# Altium PCB MainBoardPCB_PWR.PcbDoc (part 4 of 29)
Units mm, origin at the board's own origin, x right, y up, seen from the top; angles counter-clockwise.
Board outline 333.63 x 349.38 mm, 16 copper layers (L1, L2 (GND), L3 (Sign), L4 (GND), L5 (Sign), L6 (PWR/GND), L7(PWR/GND), L8 (PWR/GND), L9 (PWR/GND), L10 (PWR/GND), L11 (PWR/GND), L12 (Sign), L13 (GND), L14 (Sign), L15 (GND), L16), stack 2.503 mm thick; 2187 components, 1615 nets, 7987 pads, 1695 vias.
Unrouted connection lines stored in the file: 4757.
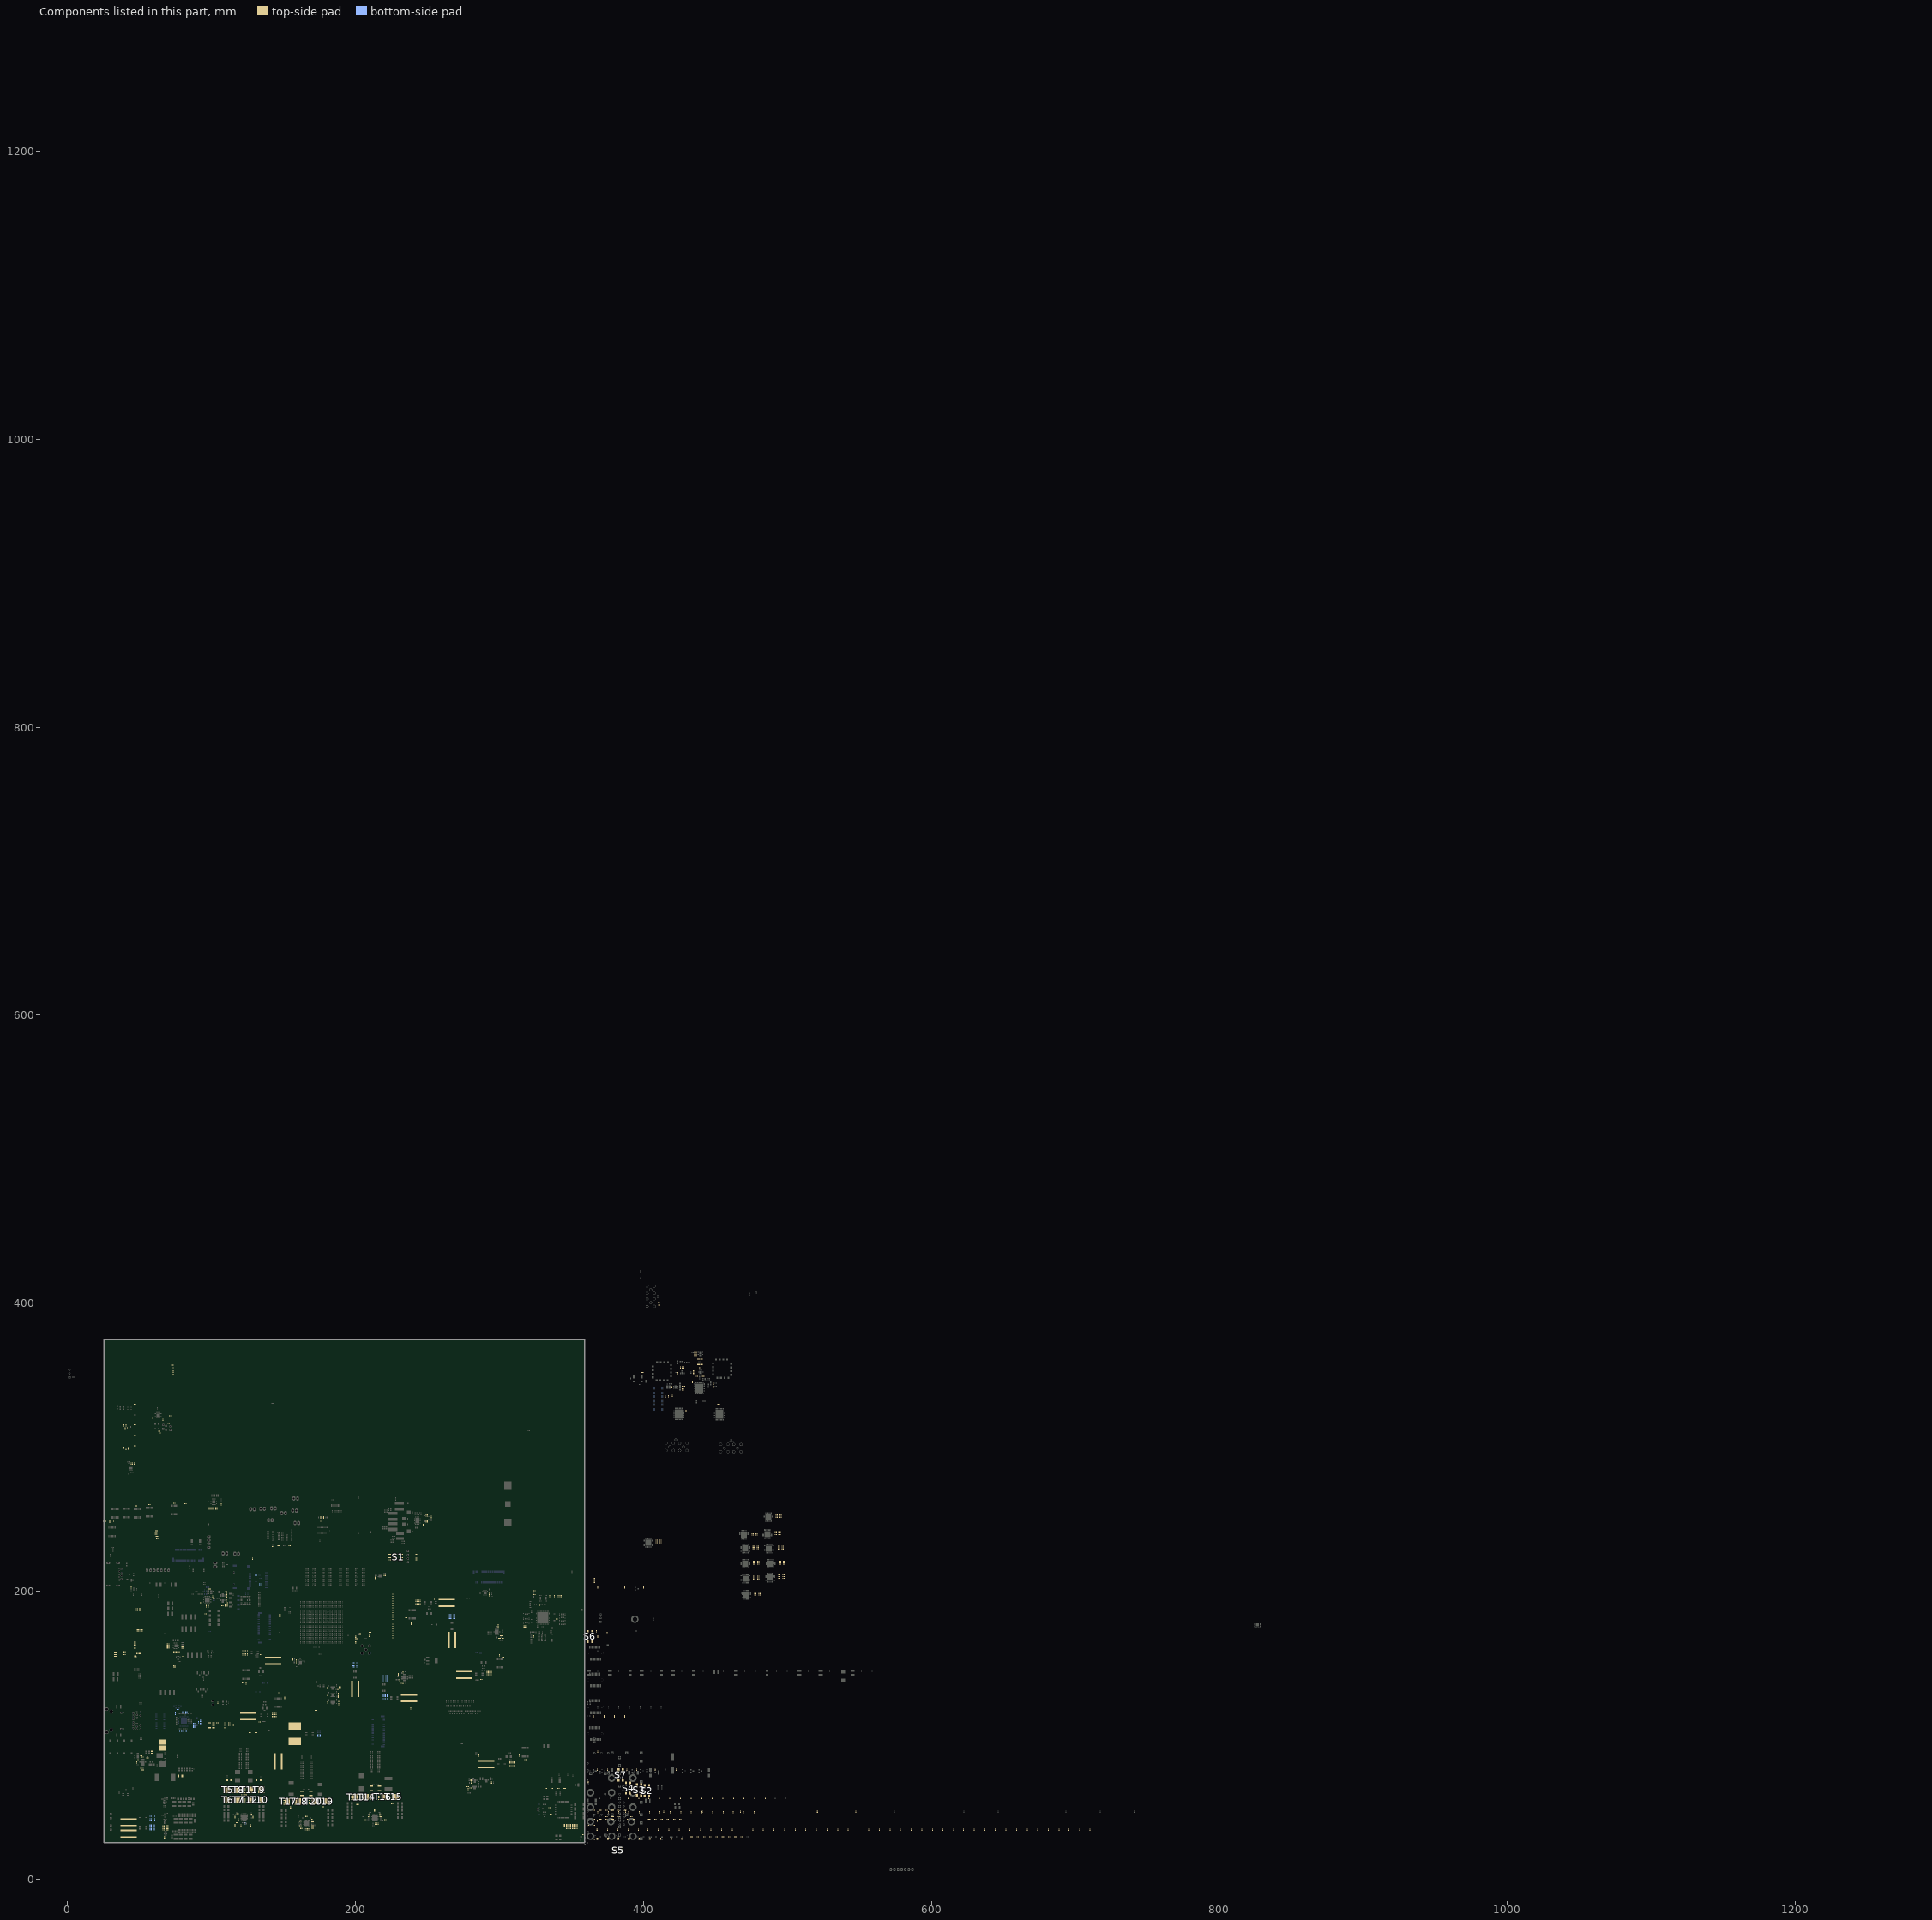
[diagram p11: the components of this part, seen from the top]

## Components (designator, comment, footprint, x,y, rotation, side; value= is the part's Value field where it differs from the comment) (continued)
R122 "30R" "RES 0402/1005 RF" 86.36,199.263 r0 top
R123 "4.7kR" "RES 0402/1005 RF" 107.442,189.738 r0 top
R124 "1kR" "RES 0402/1005 RF" 172.593,117.221 r180 top
R125 "10kR" "RES 0402/1005 RF" 339.728,180.764 r180 top
R126 "100R" "RES 0402/1005 RF" 335.899,196.61 r270 top
R127 "0R" "RES 0402/1005 RF" 367.995,40.538 r90 top
R128 "10kR" "RES 0402/1005 RF" 317.608,174.88 r180 top
R129 "10kR" "RES 0402/1005 RF" 317.608,175.819 r180 top
R130 "0R" "RES 0402/1005 RF" 334.902,196.597 r270 top
R131 "0R" "RES 0402/1005 RF" 338.144,196.597 r270 top
R132 "0R" "RES 0402/1005 RF" 342.005,196.483 r90 top
R133 "0R" "RES 0402/1005 RF" 343.021,196.483 r90 top
R134 "0R" "RES 0402/1005 RF" 340.998,196.528 r90 top
R135 "4.7kR" "RES 0402/1005 RF" 47.255,154.305 r0 top
R136 "4.7kR" "RES 0402/1005 RF" 46.99,155.067 r0 top
R137 "4.7kR" "RES 0402/1005 RF" 46.805,160.274 r0 top
R138 "4.7kR" "RES 0402/1005 RF" 33.216,154.695 r0 top
R139 "0R" "RES 0402/1005 RF" 360.883,40.538 r90 top
R140 "2.2R" "RES 0402/1005 RF" 55.575,84.026 r0 top
R141 "0R" "RES 0402/1005 RF" 50.549,156.46 r0 top
R142 "0R" "RES 0402/1005 RF" 50.549,157.494 r0 top
R143 "0R" "RES 0402/1005 RF" 48.575,156.478 r0 top
R144 "0R" "RES 0402/1005 RF" 48.575,157.494 r0 top
R145 "4.7kR" "RES 0402/1005 RF" 46.736,164.465 r0 top
R146 "4.7kR" "RES 0402/1005 RF" 46.736,162.56 r0 top
R147 "4.7kR" "RES 0402/1005 RF" 46.736,163.449 r0 top
R148 "4.7kR" "RES 0402/1005 RF" 33.216,156.981 r0 top
R149 "196kR" "RES 0402/1005 RF" 52.232,84.777 r0 top
R150 "22k" "RES 0402/1005 RF" 52.332,75.895 r0 top
R151 "0R" "RES 0402/1005 RF" 51.393,173.303 r0 top
R152 "0R" "RES 0402/1005 RF" 51.346,172.287 r0 top
R153 "0R" "RES 0402/1005 RF" 48.98,173.303 r0 top
R154 "0R" "RES 0402/1005 RF" 48.98,172.287 r0 top
R155 "4.7kR" "RES 0402/1005 RF" 39.693,158.115 r0 top
R156 "4.7kR" "RES 0402/1005 RF" 39.693,157.099 r0 top
R157 "4.7kR" "RES 0402/1005 RF" 39.684,155.829 r0 top
R158 "4.7kR" "RES 0402/1005 RF" 33.216,155.956 r0 top
R159 "10kR" "RES 0402/1005 RF" 51.307,85.787 r0 top
R160 "910R" "RES 0402/1005 RF" 51.883,77.43 r90 top
R161 "0R" "RES 0402/1005 RF" 50.473,187.654 r0 top
R162 "0R" "RES 0402/1005 RF" 50.473,186.638 r0 top
R163 "0R" "RES 0402/1005 RF" 48.234,187.654 r0 top
R164 "0R" "RES 0402/1005 RF" 48.234,186.638 r0 top
R165 "100R" "RES 0402/1005 RF" 178.738,249.428 r0 top
R166 "100R" "RES 0402/1005 RF" 176.394,248.666 r0 top
R167 "100R" "RES 0402/1005 RF" 178.029,251.222 r90 top
R168 "100R" "RES 0402/1005 RF" 175.87,251.222 r90 top
R169 "100R" "RES 0402/1005 RF" 150.495,232.621 r0 top
R170 "100R" "RES 0402/1005 RF" 146.685,231.605 r0 top
R171 "100R" "RES 0402/1005 RF" 154.292,231.605 r0 top
R172 "100R" "RES 0402/1005 RF" 142.748,230.97 r0 top
R173 "500R" "RES 0402/1005 RF" 360.883,28.042 r90 top
R174 "0mR" "RES 0402/1005 RF" 242.95,190.832 r270 top
R175 "0mR" "RES 0402/1005 RF" 241.934,190.832 r270 top
R176 "0mR" "RES 0402/1005 RF" 245.03,190.832 r270 top
R177 "0mR" "RES 0402/1005 RF" 244.014,190.832 r270 top
R178 "0mR" "RES 0402/1005 RF" 242.95,193.209 r90 top
R179 "0mR" "RES 0402/1005 RF" 241.934,193.209 r90 top
R180 "0mR" "RES 0402/1005 RF" 245.03,193.209 r90 top
R181 "0mR" "RES 0402/1005 RF" 244.014,193.209 r90 top
R182 "1.02kR" "RES 0402/1005 RF" 254.912,194.739 r90 top
R183 "0mR" "RES 0402/1005 RF" 293.357,143.679 r90 top
R184 "0mR" "RES 0402/1005 RF" 294.357,143.679 r90 top
R185 "0mR" "RES 0402/1005 RF" 291.357,143.679 r90 top
R186 "0mR" "RES 0402/1005 RF" 292.357,143.679 r90 top
R187 "0mR" "RES 0402/1005 RF" 293.357,141.493 r270 top
R188 "0mR" "RES 0402/1005 RF" 294.357,141.493 r270 top
R189 "0mR" "RES 0402/1005 RF" 291.357,141.493 r270 top
R190 "0mR" "RES 0402/1005 RF" 292.357,141.493 r270 top
R191 "1.02kR" "RES 0402/1005 RF" 287.374,138.68 r0 top
R192 "0mR" "RES 0402/1005 RF" 122.794,156.081 r270 top
R193 "0mR" "RES 0402/1005 RF" 121.735,156.081 r270 top
R194 "0mR" "RES 0402/1005 RF" 124.91,156.081 r270 top
R195 "0mR" "RES 0402/1005 RF" 123.852,156.081 r270 top
R196 "0mR" "RES 0402/1005 RF" 122.794,158.113 r90 top
R197 "0mR" "RES 0402/1005 RF" 121.735,158.113 r90 top
R198 "0mR" "RES 0402/1005 RF" 124.91,158.113 r90 top
R199 "0mR" "RES 0402/1005 RF" 123.852,158.113 r90 top
R200 "1.02kR" "RES 0402/1005 RF" 134.297,155.956 r0 top
R201 "0mR" "RES 0402/1005 RF" 144.008,114.727 r90 top
R202 "0mR" "RES 0402/1005 RF" 144.958,114.727 r90 top
R203 "0mR" "RES 0402/1005 RF" 142.088,114.727 r90 top
R204 "0mR" "RES 0402/1005 RF" 143.053,114.732 r90 top
R205 "0mR" "RES 0402/1005 RF" 144.008,112.571 r270 top
R206 "0mR" "RES 0402/1005 RF" 144.958,112.571 r270 top
R207 "0mR" "RES 0402/1005 RF" 142.088,112.568 r270 top
R208 "0mR" "RES 0402/1005 RF" 143.053,112.568 r270 top
R209 "1.02kR" "RES 0402/1005 RF" 133.501,109.15 r180 top
R210 "0mR" "RES 0402/1005 RF" 309.27,81.218 r90 top
R211 "0mR" "RES 0402/1005 RF" 310.314,81.218 r90 top
R212 "12.5k" "RES 0402/1005 RF" 251.788,251.574 r90 top
R213 "0mR" "RES 0402/1005 RF" 307.166,81.218 r90 top
R214 "10kR" "RES 0402/1005 RF" 252.738,251.574 r270 top
R215 "0mR" "RES 0402/1005 RF" 308.227,81.218 r90 top
R216 "31.2kR" "RES 0402/1005 RF" 249.13,252.624 r270 top
R217 "0mR" "RES 0402/1005 RF" 309.27,78.437 r270 top
R218 "10kR" "RES 0402/1005 RF" 250.096,252.624 r270 top
R219 "0mR" "RES 0402/1005 RF" 310.314,78.437 r270 top
R220 "4.99kR" "RES 0402/1005 RF" 249.13,248.499 r270 top
R221 "0mR" "RES 0402/1005 RF" 307.166,78.441 r270 top
R222 "0mR" "RES 0402/1005 RF" 308.227,78.441 r270 top
R223_I2C_Bridge "1kR" "RES 0402/1005 RF" 106.426,260.867 r0 top (schematic designator R223)
R223_I2C_Bridge_2 "1kR" "RES 0402/1005 RF" 547.548,46.787 r90 top (schematic designator R223)
R223_I2C_Bridge_3 "1kR" "RES 0402/1005 RF" 79.952,161.248 r0 top (schematic designator R223)
R224_I2C_Bridge "1kR" "RES 0402/1005 RF" 106.426,259.812 r0 top (schematic designator R224)
R224_I2C_Bridge_2 "1kR" "RES 0402/1005 RF" 520.878,46.787 r90 top (schematic designator R224)
R224_I2C_Bridge_3 "1kR" "RES 0402/1005 RF" 79.952,160.274 r0 top (schematic designator R224)
R225_I2C_Bridge "1kR" "RES 0402/1005 RF" 103.886,257.487 r270 top (schematic designator R225)
R225_I2C_Bridge_2 "1kR" "RES 0402/1005 RF" 494.208,46.787 r90 top (schematic designator R225)
R225_I2C_Bridge_3 "1kR" "RES 0402/1005 RF" 77.471,157.607 r270 top (schematic designator R225)
R226_I2C_Bridge "1kR" "RES 0402/1005 RF" 102.85,257.487 r270 top (schematic designator R226)
R226_I2C_Bridge_2 "1kR" "RES 0402/1005 RF" 467.538,46.787 r90 top (schematic designator R226)
R226_I2C_Bridge_3 "1kR" "RES 0402/1005 RF" 76.506,157.607 r270 top (schematic designator R226)
R227_I2C_Bridge "1kR" "RES 0402/1005 RF" 101.85,257.487 r270 top (schematic designator R227)
R227_I2C_Bridge_2 "1kR" "RES 0402/1005 RF" 440.893,46.787 r90 top (schematic designator R227)
R227_I2C_Bridge_3 "1kR" "RES 0402/1005 RF" 75.54,157.607 r270 top (schematic designator R227)
R228 "1.02kR" "RES 0402/1005 RF" 285.883,85.729 r90 top
R229 "0mR" "RES 0402/1005 RF" 59.385,37.078 r90 bottom
R230 "0mR" "RES 0402/1005 RF" 60.465,37.078 r90 bottom
R231_SPI_bridge1 "1kR" "RES 0402/1005 RF" 238.618,177.387 r90 top (schematic designator R231)
R231_SPI_bridge2 "1kR" "RES 0402/1005 RF" 411.039,398.754 r0 top (schematic designator R231)
R231_SPI_bridge3 "1kR" "RES 0402/1005 RF" 74.237,261.112 r180 top (schematic designator R231)
R232_SPI_bridge1 "1kR" "RES 0402/1005 RF" 235.247,181.451 r0 top (schematic designator R232)
R232_SPI_bridge2 "1kR" "RES 0402/1005 RF" 410.716,400.405 r0 top (schematic designator R232)
R232_SPI_bridge3 "1kR" "RES 0402/1005 RF" 62.103,238.125 r0 top (schematic designator R232)
R233_SPI_bridge1 "1kR" "RES 0402/1005 RF" 299.974,155.533 r270 top (schematic designator R233)
R233_SPI_bridge2 "1kR" "RES 0402/1005 RF" 420.04,335.691 r90 top (schematic designator R233)
R233_SPI_bridge3 "1kR" "RES 0402/1005 RF" 96.012,184.333 r180 top (schematic designator R233)
R234_SPI_bridge1 "1kR" "RES 0402/1005 RF" 302.583,154.136 r180 top (schematic designator R234)
R234_SPI_bridge2 "1kR" "RES 0402/1005 RF" 415.158,335.114 r90 top (schematic designator R234)
R234_SPI_bridge3 "1kR" "RES 0402/1005 RF" 61.838,241.935 r0 top (schematic designator R234)
R235_SPI_bridge1 "1kR" "RES 0402/1005 RF" 121.772,136.265 r0 top (schematic designator R235)
R235_SPI_bridge2 "1kR" "RES 0402/1005 RF" 417.444,335.437 r90 top (schematic designator R235)
R235_SPI_bridge3 "1kR" "RES 0402/1005 RF" 62.288,236.453 r0 top (schematic designator R235)
R236_SPI_bridge1 "1kR" "RES 0402/1005 RF" 123.952,135.763 r90 top (schematic designator R236)
R236_SPI_bridge2 "1kR" "RES 0402/1005 RF" 433.984,345.313 r90 top (schematic designator R236)
R236_SPI_bridge3 "1kR" "RES 0402/1005 RF" 47.498,259.207 r180 top (schematic designator R236)
R237_SPI_bridge1 "1kR" "RES 0402/1005 RF" 151.003,125.857 r90 top (schematic designator R237)
R237_SPI_bridge2 "1kR" "RES 0402/1005 RF" 32.004,248.92 r90 top (schematic designator R237)
R237_SPI_bridge3 "1kR" "RES 0402/1005 RF" 61.503,240.792 r0 top (schematic designator R237)
R238_SPI_bridge1 "1kR" "RES 0402/1005 RF" 146.685,129.032 r270 top (schematic designator R238)
R238_SPI_bridge2 "1kR" "RES 0402/1005 RF" 29.464,248.285 r90 top (schematic designator R238)
R238_SPI_bridge3 "1kR" "RES 0402/1005 RF" 56.896,260.096 r180 top (schematic designator R238)
R239_SPI_bridge1 "1kR" "RES 0402/1005 RF" 313.893,85.725 r270 top (schematic designator R239)
R239_SPI_bridge2 "1kR" "RES 0402/1005 RF" 26.543,249.047 r90 top (schematic designator R239)
R239_SPI_bridge3 "1kR" "RES 0402/1005 RF" 61.503,239.649 r0 top (schematic designator R239)
R240_SPI_bridge1 "1kR" "RES 0402/1005 RF" 318.028,83.058 r0 top (schematic designator R240)
R240_SPI_bridge2 "1kR" "RES 0402/1005 RF" 25.019,248.92 r90 top (schematic designator R240)
R240_SPI_bridge3 "1kR" "RES 0402/1005 RF" 81.973,260.858 r180 top (schematic designator R240)
R241 "0mR" "RES 0402/1005 RF" 411.963,28.042 r90 top
R242 "0mR" "RES 0402/1005 RF" 404.597,28.042 r90 top
R243 "0mR" "RES 0402/1005 RF" 397.205,28.042 r90 top
R244 "0mR" "RES 0402/1005 RF" 389.839,28.042 r90 top
R245 "100R" "RES 0402/1005 RF" 439.318,355.092 r180 top
R246 "120R" "RES 0402/1005 RF" 440.303,361.061 r180 top
R247 "127R" "RES 0402/1005 RF" 440.303,357.251 r180 top
R248 "127R" "RES 0402/1005 RF" 438.202,357.251 r0 top
R249 "120R" "RES 0402/1005 RF" 438.202,361.061 r180 top
R250 "82.5R" "RES 0402/1005 RF" 440.303,358.267 r180 top
R251 "82.5R" "RES 0402/1005 RF" 438.202,358.267 r0 top
R252 "1kR" "RES 0402/1005 RF" 435.635,366.083 r90 top
R253 "1kR" "RES 0402/1005 RF" 435.635,364.079 r270 top
R254 "1kR" "RES 0402/1005 RF" 436.651,366.083 r270 top
R255 "1kR" "RES 0402/1005 RF" 436.651,364.079 r90 top
R256 "120R" "RES 0402/1005 RF" 431.825,350.774 r90 top
R257 "49.9R" "RES 0402/1005 RF" 423.951,351.467 r90 top
R258 "120R" "RES 0402/1005 RF" 431.825,352.711 r90 top
R259 "82.5R" "RES 0402/1005 RF" 435.635,352.711 r270 top
R260 "82.5R" "RES 0402/1005 RF" 435.635,350.774 r90 top
R261 "127R" "RES 0402/1005 RF" 434.619,352.711 r270 top
R262 "127R" "RES 0402/1005 RF" 434.619,350.774 r90 top
R263 "60.4kR" "RES 0402/1005 RF" 425.602,355.288 r270 top
R264 "0mR" "RES 0402/1005 RF" 428.112,355.288 r270 top
R265 "0mR" "RES 0402/1005 RF" 426.887,355.288 r270 top
R266 "84.5kR" "RES 0402/1005 RF" 383.235,32.182 r0 top
R267 "4.7kR" "RES 0402/1005 RF" 370.04,32.182 r0 top
R268 "2R" "RES 0402/1005 RF" 120.402,37.326 r90 top
R269 "1.02kR" "RES 0402/1005 RF" 361.391,32.182 r0 top
R270 "160R" "RES 0402/1005 RF" 238.506,118.618 r270 top
R271 "5kR" "RES 0402/1005 RF" 117.796,39.126 r180 top
R272 "2R" "RES 0402/1005 RF" 122.978,38.69 r270 top
R273 "12kR" "RES 0402/1005 RF" 118.596,41.473 r270 top
R274 "10kR" "RES 0402/1005 RF" 250.096,248.503 r90 top
R275 "47kR" "RES 0402/1005 RF" 121.202,58.572 r180 top
R276 "4.7kR" "RES 0402/1005 RF" 387.363,47.739 r0 top
R277 "12kR" "RES 0402/1005 RF" 128.799,43.024 r90 top
R278 "12kR" "RES 0402/1005 RF" 116.439,43.024 r90 top
R279 "0mR" "RES 0402/1005 RF" 383.045,47.739 r0 top
R280 "47kR" "RES 0402/1005 RF" 123.777,58.572 r0 top
R281 "0mR" "RES 0402/1005 RF" 382.981,28.042 r90 top
R282 "0mR" "RES 0402/1005 RF" 378.714,47.739 r0 top
R283 "0mR" "RES 0402/1005 RF" 374.383,47.739 r0 top
R284 "18.2k (1MHz)" "RES 0402/1005 RF" 247.126,245.841 r90 top
R285 "2R" "RES 0402/1005 RF" 201.462,51.702 r0 top
R286 "0mR" "RES 0402/1005 RF" 370.053,47.739 r0 top
R287 "49.9kR" "RES 0402/1005 RF" 205.838,40.864 r90 top
R288 "Resistor_1210" RES_1210 211.045,63.039 r270 top value=3.6R
R289 "2R" "RES 0402/1005 RF" 213.795,38.516 r270 top
R290 "10kR" "RES 0402/1005 RF" 206.788,40.864 r270 top
R291 "150R" "RES 0402/1005 RF" 365.722,47.739 r0 top
R292 "Resistance" "RES 0402/1005 RF" 213.195,47.846 r270 top
R293 "0mR" "RES 0402/1005 RF" 214.795,38.516 r90 top
R294 "0mR" "RES 0402/1005 RF" 215.795,38.516 r90 top
R295 "12kR" "RES 0402/1005 RF" 209.441,43.359 r0 top
R296 "12kR" "RES 0402/1005 RF" 217.555,43.359 r180 top
R297 "10kR" "RES 0402/1005 RF" 221.201,40.765 r90 top
R298 "Resistor_1210" RES_1210 216.76,63.039 r270 top value=3.6R
R299 "47kR" "RES 0402/1005 RF" 214.045,47.846 r270 top
R300 "10kR" "RES 0402/1005 RF" 220.17,40.765 r270 top
R301 "150R" "RES 0402/1005 RF" 391.655,43.434 r0 top
R302 "1.4kR" "RES 0201/0603" 170.009,41.515 r180 top
R303 "2R" "RES 0402/1005 RF" 155.178,49.178 r0 top
R304 "0mR" "RES 0402/1005 RF" 175.712,99.689 r270 bottom
R305 "100R" "RES 0402/1005 RF" 383.019,43.434 r0 top
R306 "Resistor_1210" RES_1210 162.816,59.629 r270 top value=3.6R
R307 "2R" "RES 0402/1005 RF" 165.608,34.537 r270 top
R308 "100R" "RES 0402/1005 RF" 378.689,43.434 r0 top
R309 "100R" "RES 0402/1005 RF" 374.358,43.434 r0 top
R310 "0mR" "RES 0402/1005 RF" 166.533,34.537 r90 top
R311 "100R" "RES 0402/1005 RF" 361.391,67.488 r0 top
R312 "0mR" "RES 0402/1005 RF" 167.448,34.537 r90 top
R313 "12kR" "RES 0402/1005 RF" 161.743,40.015 r0 top
R314 "12kR" "RES 0402/1005 RF" 170.224,39.685 r180 top
R315 "196kR" "RES 0402/1005 RF" 170.224,36.103 r0 top
R316 "Resistor_1210" RES_1210 169.006,59.629 r270 top value=3.6R
R317 "47kR" "RES 0402/1005 RF" 166.458,43.718 r270 top
R318 "27kR" "RES 0402/1005 RF" 170.224,35.175 r180 top
R319 "10kR" "RES 0402/1005 RF" 92.075,109.935 r90 bottom
R320 "10kR" "RES 0402/1005 RF" 92.075,107.893 r270 bottom
R321 "100R" "RES 0402/1005 RF" 90.932,109.035 r90 bottom
R322 "5.76kR" "RES 0402/1005 RF" 88.392,107.765 r90 bottom
R323 "5.76kR" "RES 0402/1005 RF" 87.376,105.915 r270 bottom
R324 "100kR" "RES 0805/2012 RF" 58.578,87.994 r270 top
R325 "2.49kR" "RES 0402/1005 RF" 93.028,109.924 r270 bottom
R326 "2.49kR" "RES 0402/1005 RF" 93.028,107.893 r90 bottom
R327 "2.49kR" "RES 0402/1005 RF" 87.376,107.765 r270 bottom
R328 "2.49kR" "RES 0402/1005 RF" 88.392,105.915 r90 bottom
R329 "100R" "RES 0402/1005 RF" 78.022,103.113 r270 bottom
R330 "100R" "RES 0402/1005 RF" 79.022,103.113 r270 bottom
R331 "100R" "RES 0402/1005 RF" 80.022,103.113 r270 bottom
R332 "100R" "RES 0402/1005 RF" 82.522,103.113 r90 bottom
R333 "2.2kR" "RES 0402/1005 RF" 80.007,115.766 r270 bottom
R334 "11kR" "RES 0402/1005" 74.93,114.741 r90 bottom
R335 "1MR" "RES 0402/1005 RF" 76.516,117.836 r180 bottom
R336 "2.2kR" "RES 0402/1005 RF" 83.038,115.766 r270 bottom
R337 "2.2kR" "RES 0402/1005 RF" 81.022,115.766 r270 bottom
R338 "2.2kR" "RES 0402/1005 RF" 82.022,115.766 r270 bottom
R339 "105kR" "RES 0402/1005 RF" 110.692,198.11 r90 top
R340 "10kR" "RES 0402/1005 RF" 110.226,199.669 r0 top
R341 "15kR" "RES 0402/1005 RF" 110.692,196.185 r90 top
R342 "105kR" "RES 0402/1005 RF" 110.392,193.552 r90 top
R343 "10kR" "RES 0402/1005 RF" 110.957,190.202 r270 top
R344 "15kR" "RES 0402/1005 RF" 110.84,192.073 r180 top
R345 "0R" "RES 0402/1005 RF" 109.572,190.186 r90 top
R346 "4.7kR" "RES 0402/1005 RF" 70.254,316.535 r0 top
R347 "4.7kR" "RES 0402/1005 RF" 147.389,182.53 r0 top
R348 "4.7kR" "RES 0402/1005 RF" 147.447,183.642 r0 top
R349 "4.7kR" "RES 0402/1005 RF" 242.639,221.742 r0 top
R350 "4.7kR" "RES 0402/1005 RF" 242.639,223.054 r0 top
R351 "4.7kR" "RES 0402/1005 RF" 242.639,224.367 r0 top
R352 "4.7kR" "RES 0402/1005 RF" 242.639,225.679 r0 top
R353 "4.7kR" "RES 0402/1005 RF" 39.301,299.653 r90 top
R354 "4.7kR" "RES 0402/1005 RF" 63.754,311.201 r0 top
R355 "4.7kR" "RES 0402/1005 RF" 64.135,309.931 r0 top
R356 "4.7kR" "RES 0402/1005 RF" 42.028,299.203 r270 top
R357 "4.7kR" "RES 0402/1005 RF" 40.728,298.753 r90 top
R358 "499R" "RES 0402/1005 RF" 224.045,221.86 r180 top
R359 "499R" "RES 0402/1005 RF" 223.845,223.139 r180 top
R360 "499R" "RES 0402/1005 RF" 223.845,224.409 r180 top
R361 "499R" "RES 0402/1005 RF" 223.845,225.679 r180 top
R362 "30R" "RES 0402/1005 RF" 38.539,312.801 r90 top
R363 "4.7kR" "RES 0402/1005 RF" 39.301,315.156 r90 top
R364 "4.7kR" "RES 0402/1005 RF" 40.078,312.87 r90 top
R365 "4.7kR" "RES 0402/1005 RF" 41.46,312.928 r90 top
R366 "10kR" "RES 0402/1005 RF" 40.825,315.087 r90 top
R367 "4.7kR" "RES 0402/1005 RF" 71.27,321.691 r0 top
R368 "261R" "RES 0402/1005 RF" 46.863,329.819 r180 top
R369 "10kR" "RES 0402/1005 RF" 66.317,318.948 r90 top
R370 "10kR" "RES 0402/1005 RF" 46.863,300.863 r180 top
R371 "10kR" "RES 0402/1005 RF" 46.863,308.229 r180 top
R372 "8.06kR" "RES 0402/1005 RF" 46.863,315.595 r180 top
R373 "10kR" "RES 0402/1005 RF" 59.078,320.472 r90 top
R374 "4.7MR" "RES 0402/1005 RF" 157.874,199.339 r0 top
R375 "40.2R" "RES 0402/1005 RF" 128.637,222.542 r270 top
R376 "0R" "RES 0402/1005 RF" 92.603,192.052 r180 top
R377 "0R" "RES 0402/1005 RF" 96.278,189.529 r270 top
R378 "0R" "RES 0402/1005 RF" 97.778,189.529 r270 top
R379 "8.06kR" "RES 0402/1005 RF" 100.851,196.372 r270 top
R380 "4.22kR" "RES 0402/1005 RF" 44.348,202.539 r270 top
R381 "4.7kR" "RES 0402/1005 RF" 133.789,205.105 r180 bottom
R382 "4.7kR" "RES 0402/1005 RF" 133.8,203.835 r180 bottom
R383 "10kR" "RES 0402/1005 RF" 130.937,211.074 r0 bottom
R384 "71.5R" "RES 0402/1005 RF" 365.76,208.915 r0 top
R385 "71.5R" "RES 0402/1005 RF" 365.76,207.899 r0 top
R386 "8.87kR" "RES 0402/1005 RF" 365.76,206.883 r0 top
R387 "5.1kR" "RES 0402/1005 RF" 365.76,205.867 r0 top
R388 "0mR" "RES 0402/1005 RF" 176.728,99.689 r270 bottom
R389 "0mR" "RES 0402/1005 RF" 174.687,99.695 r270 bottom
R390 "0mR" "RES 0402/1005 RF" 173.68,99.689 r270 bottom
R391 "75kR" "RES 0402/1005 RF" 188.725,132.945 r90 top
R392 "100kR" "RES 0402/1005 RF" 189.711,132.945 r90 top
R393 "15kR" "RES 0402/1005 RF" 187.696,131.995 r90 top
R394 "51.1kR" "RES 0402/1005 RF" 188.22,128.702 r90 top
R395 "10kR" "RES 0402/1005 RF" 189.244,128.704 r90 top
R396 "15kR" "RES 0402/1005 RF" 188.22,126.719 r90 top
R397 "21.5kR" "RES 0402/1005 RF" 188.266,123.575 r90 top
R398 "10kR" "RES 0402/1005 RF" 189.244,123.575 r90 top
R399 "15kR" "RES 0402/1005 RF" 188.266,121.609 r90 top
R400 "0mR" "RES 0402/1005 RF" 375.615,28.042 r90 top
R401 "10k" "RES 0402/1005 RF" 345.349,37.41 r90 top
R402 "0R" "RES 0402/1005 RF" 348.539,37.41 r270 top
R403 "0R" "RES 0402/1005 RF" 348.539,35.378 r90 top
R404 "0R" "RES 0402/1005 RF" 349.603,37.41 r270 top
R405 "0R" "RES 0402/1005 RF" 349.603,35.378 r90 top
R406 "0R" "RES 0402/1005 RF" 347.476,37.41 r270 top
R407 "0R" "RES 0402/1005 RF" 347.476,35.378 r90 top
R408 "0R" "RES 0402/1005 RF" 346.412,37.41 r270 top
R409 "0R" "RES 0402/1005 RF" 346.412,35.378 r90 top
R410 "10k" "RES 0402/1005 RF" 344.285,37.41 r90 top
R411 "0R" "RES 0402/1005 RF" 351.73,37.41 r270 top
R412 "0R" "RES 0402/1005 RF" 351.73,35.378 r90 top
R413 "0R" "RES 0402/1005 RF" 353.857,37.41 r270 top
R414 "0R" "RES 0402/1005 RF" 353.857,35.378 r90 top
R415 "0R" "RES 0402/1005 RF" 350.666,37.41 r270 top
R416 "0R" "RES 0402/1005 RF" 350.666,35.378 r90 top
R417 "10k" "RES 0402/1005 RF" 345.364,62.879 r0 top
R418 "0R" "RES 0402/1005 RF" 352.794,37.41 r270 top
R419 "2kR" "RES 0402/1005 RF" 340.919,62.879 r0 top
R420 "10k" "RES 0402/1005 RF" 336.601,62.879 r0 top
R421 "0R" "RES 0402/1005 RF" 352.794,35.378 r90 top
R422 "10k" "RES 0402/1005 RF" 332.283,62.879 r0 top
R423 "12kR" "RES 0402/1005 RF" 334.765,49.731 r0 top
R424 "1kR" "RES 0402/1005 RF" 335.712,45.043 r0 top
R425 "4.7kR" "RES 0402/1005 RF" 74.177,148.171 r0 top
R426 "4.7kR" "RES 0402/1005 RF" 74.295,147.154 r0 top
R427 "1kR" "RES 0402/1005 RF" 365.722,37.401 r0 top
R428 "1kR" "RES 0402/1005 RF" 368.249,28.042 r90 top
R429 "0mR" "RES 0402/1005 RF" 80.518,154.631 r0 top
R430_5V_to_3V3_for_FTDI "105kR" "RES 0402/1005 RF" 45.226,288.642 r90 top (schematic designator R430)
R430_U_5V_to_3V31 "105kR" "RES 0402/1005 RF" 280.294,67.009 r270 top (schematic designator R430)
R430_U_5V_to_3V32 "105kR" "RES 0402/1005 RF" 279.936,63.209 r180 top (schematic designator R430)
R430_U_5V_to_3V33 "105kR" "RES 0402/1005 RF" 294.81,67.053 r90 top (schematic designator R430)
R431_5V_to_3V3_for_FTDI "100kR" "RES 0402/1005 RF" 46.267,288.642 r90 top (schematic designator R431)
R431_U_5V_to_3V31 "100kR" "RES 0402/1005 RF" 280.259,68.959 r270 top (schematic designator R431)
R431_U_5V_to_3V32 "100kR" "RES 0402/1005 RF" 278.329,62.584 r270 top (schematic designator R431)
R431_U_5V_to_3V33 "100kR" "RES 0402/1005 RF" 293.804,67.053 r90 top (schematic designator R431)
R432_5V_to_3V3_for_FTDI "15kR" "RES 0402/1005 RF" 44.222,288.642 r270 top (schematic designator R432)
R432_U_5V_to_3V31 "15kR" "RES 0402/1005 RF" 374.777,170.942 r90 top (schematic designator R432)
R432_U_5V_to_3V32 "15kR" "RES 0402/1005 RF" 278.079,64.209 r0 top (schematic designator R432)
R432_U_5V_to_3V33 "15kR" "RES 0402/1005 RF" 295.26,65.516 r180 top (schematic designator R432)
R433 "56kR" "RES 0402/1005 RF" 292.935,199.031 r90 top
R434 "10kR" "RES 0402/1005 RF" 292.935,197.103 r90 top
R435 "10kR" "RES 0402/1005 RF" 368.249,168.402 r90 top
R436 "3.57kR" "RES 0402/1005 RF" 231.436,135.975 r180 top
R437 "1.15kR" "RES 0402/1005 RF" 233.007,136.158 r90 top
R438 "3.57kR" "RES 0402/1005 RF" 230.837,142.264 r270 top
R439 "1.15kR" "RES 0402/1005 RF" 232.981,143.622 r270 top
R440 "20kR" "RES 0402/1005 RF" 230.82,138.271 r90 top
R441 "20kR" "RES 0402/1005 RF" 229.707,142.252 r270 top
R442 "100kR" "RES 0402/1005 RF" 419.739,341.667 r90 top
R443 "698kR" "RES 0805/2012 RF" 427.76,341.942 r180 top
R444 "49.9kR" "RES 0402/1005 RF" 427.76,340.092 r90 top
R445 "49.9kR" "RES 0402/1005 RF" 426.79,340.092 r90 top
R446 "120R" "RES 0402/1005 RF" 105.893,122.478 r270 top
R447 "120R" "RES 0402/1005 RF" 104.369,122.478 r270 top
R448_U_Pomiar_pradu_napiecia_1 "FCSL110R005FER" FCSL110R005FERCT-ND 42.52,31.521 r90 top (schematic designator R448)
R448_U_Pomiar_pradu_napiecia_2 "FCSL110R005FER" FCSL110R005FERCT-ND 42.52,39.488 r90 top (schematic designator R448)
R448_U_Pomiar_pradu_napiecia_3 "FCSL110R005FER" FCSL110R005FERCT-ND 199.853,132.167 r180 top (schematic designator R448)
R448_U_Pomiar_pradu_napiecia_4 "FCSL110R005FER" FCSL110R005FERCT-ND 267.157,166.04 r180 top (schematic designator R448)
R448_U_Pomiar_pradu_napiecia_5 "FCSL110R005FER" FCSL110R005FERCT-ND 146.528,81.817 r180 top (schematic designator R448)
R448_U_Pomiar_pradu_napiecia_6 "FCSL110R005FER" FCSL110R005FERCT-ND 237.191,125.705 r270 top (schematic designator R448)
R448_U_Pomiar_pradu_napiecia_7 "FCSL110R005FER" FCSL110R005FERCT-ND 263.383,191.865 r90 top (schematic designator R448)
R448_U_Pomiar_pradu_napiecia_8 "FCSL110R005FER" FCSL110R005FERCT-ND 275.463,141.817 r90 top (schematic designator R448)
R448_U_Pomiar_pradu_napiecia_9 "FCSL110R005FER" FCSL110R005FERCT-ND 142.875,151.638 r270 top (schematic designator R448)
R448_U_Pomiar_pradu_napiecia_10 "FCSL110R005FER" FCSL110R005FERCT-ND 125.603,113.157 r270 top (schematic designator R448)
R448_U_Pomiar_pradu_napiecia_11 "FCSL110R005FER" FCSL110R005FERCT-ND 291.033,79.756 r90 top (schematic designator R448)
R449 "0mR" "RES 0402/1005 RF" 73.007,355.27 r0 top
R450 "0mR" "RES 0402/1005 RF" 73.007,354.254 r0 top
R451 "0mR" "RES 0402/1005 RF" 73.007,350.698 r0 top
R452 "0mR" "RES 0402/1005 RF" 72.88,356.794 r0 top
R453 "0mR" "RES 0402/1005 RF" 73.007,352.026 r0 top
R454 "0mR" "RES 0402/1005 RF" 73.007,353.111 r0 top
R455 "0mR" "RES 0402/1005 RF" 476.822,210.411 r180 top
R456 "0mR" "RES 0402/1005 RF" 479.754,210.411 r0 top
R457 "0mR" "RES 0402/1005 RF" 58.339,37.078 r90 bottom
R458 "0mR" "RES 0402/1005 RF" 476.822,209.367 r180 top
R459 "0mR" "RES 0402/1005 RF" 57.298,37.078 r90 bottom
R460 "0mR" "RES 0402/1005 RF" 479.754,209.367 r0 top
R461 "0mR" "RES 0402/1005 RF" 59.385,34.722 r270 bottom
R462 "0mR" "RES 0402/1005 RF" 476.822,208.345 r180 top
R463 "0mR" "RES 0402/1005 RF" 60.465,34.724 r270 bottom
R464 "0mR" "RES 0402/1005 RF" 479.754,208.345 r0 top
R465 "0mR" "RES 0402/1005 RF" 58.339,34.713 r270 bottom
R466 "0mR" "RES 0402/1005 RF" 57.298,34.713 r270 bottom
R467 "0mR" "RES 0402/1005 RF" 59.434,44.111 r90 bottom
R468 "0mR" "RES 0402/1005 RF" 60.53,44.111 r90 bottom
R469 "0mR" "RES 0402/1005 RF" 68.571,163.01 r90 top
R470 "0mR" "RES 0402/1005 RF" 68.571,161.036 r270 top
R471 "0mR" "RES 0402/1005 RF" 69.587,163.01 r90 top
R472 "0mR" "RES 0402/1005 RF" 69.587,161.036 r270 top
R473 "0mR" "RES 0402/1005 RF" 70.603,163.01 r90 top
R474 "0mR" "RES 0402/1005 RF" 70.603,161.036 r270 top
R475 "0mR" "RES 0402/1005 RF" 475.839,238.894 r180 top
R476 "0mR" "RES 0402/1005 RF" 478.551,238.902 r0 top
R477 "0mR" "RES 0402/1005 RF" 475.843,239.931 r180 top
R478 "0mR" "RES 0402/1005 RF" 478.555,239.939 r0 top
R479 "0mR" "RES 0402/1005 RF" 475.843,240.976 r180 top
R480 "0mR" "RES 0402/1005 RF" 478.555,240.983 r0 top
R481 "0R" "RES 0402/1005 RF" 399.275,351.917 r0 top
R482 "150R" "RES 0402/1005 RF" 200.602,166.927 r180 top
R483 "150R" "RES 0402/1005 RF" 200.602,165.927 r180 top
R484 "71.5R" "RES 0402/1005 RF" 200.152,168.377 r270 top
R485 "71.5R" "RES 0402/1005 RF" 200.152,164.477 r90 top
R486 "8.87kR" "RES 0402/1005 RF" 203.327,170.208 r90 top
R487 "5.1kR" "RES 0402/1005 RF" 210.085,170.283 r180 top
R488 "1kR" "RES 0402/1005 RF" 210.085,171.299 r180 top
R489 "100R" "RES 0402/1005 RF" 209.635,168.811 r90 top
R490 "10kR" "RES 0402/1005 RF" 101.631,194.927 r180 top
R491 "1MR" "RES 0402/1005 RF" 98.778,201.381 r0 top
R492 "0mR" "RES 0402/1005 RF" 494.388,209.018 r180 top
R493 "0mR" "RES 0402/1005 RF" 497.283,209.024 r0 top
R494 "0mR" "RES 0402/1005 RF" 494.388,210.124 r180 top
R495 "0mR" "RES 0402/1005 RF" 497.283,210.117 r0 top
R496 "0mR" "RES 0402/1005 RF" 494.388,211.217 r180 top
R497 "0mR" "RES 0402/1005 RF" 497.283,211.217 r0 top
R498 "0R" "RES 0402/1005 RF" 130.93,101.697 r0 top
R499 "1kR" "RES 0402/1005 RF" 126.612,101.697 r0 top
R500 "0mR" "RES 0402/1005 RF" 476.965,218.647 r180 top
R501 "0mR" "RES 0402/1005 RF" 479.754,218.65 r0 top
R502 "0mR" "RES 0402/1005 RF" 476.965,219.7 r180 top
R503 "0mR" "RES 0402/1005 RF" 479.754,219.702 r0 top
R504 "0mR" "RES 0402/1005 RF" 476.965,220.747 r180 top
R505 "0mR" "RES 0402/1005 RF" 479.754,220.75 r0 top
R506 "10kR" "RES 0402/1005 RF" 226.325,181.89 r180 top
R507 "10kR" "RES 0402/1005 RF" 226.325,183.5 r180 top
R508 "0mR" "RES 0402/1005 RF" 494.829,218.656 r180 top
R509 "0mR" "RES 0402/1005 RF" 497.822,218.656 r0 top
R510 "0mR" "RES 0402/1005 RF" 494.829,219.683 r180 top
R511 "0mR" "RES 0402/1005 RF" 497.822,219.7 r0 top
R512 "0mR" "RES 0402/1005 RF" 494.83,220.7 r180 top
R513 "0mR" "RES 0402/1005 RF" 497.822,220.7 r0 top
R514 "10kR" "RES 0402/1005 RF" 226.325,178.669 r180 top
R515 "10kR" "RES 0402/1005 RF" 226.325,177.059 r180 top
R516 "0mR" "RES 0402/1005 RF" 491.927,241.49 r180 top
R517 "0mR" "RES 0402/1005 RF" 494.546,241.49 r0 top
R518 "0mR" "RES 0402/1005 RF" 491.927,240.386 r180 top
R519 "0mR" "RES 0402/1005 RF" 494.546,240.386 r0 top
R520 "0mR" "RES 0402/1005 RF" 491.929,239.273 r180 top
R521 "0mR" "RES 0402/1005 RF" 494.548,239.273 r0 top
R522 "10kR" "RES 0402/1005 RF" 226.325,167.397 r180 top
R523 "10kR" "RES 0402/1005 RF" 226.325,169.007 r180 top
R524 "0mR" "RES 0402/1005 RF" 409.272,233.02 r180 top
R525 "0mR" "RES 0402/1005 RF" 411.931,233.02 r0 top
R526 "0mR" "RES 0402/1005 RF" 409.272,234.17 r180 top
R527 "0mR" "RES 0402/1005 RF" 411.931,234.17 r0 top
R528 "0mR" "RES 0402/1005 RF" 409.272,235.364 r180 top
R529 "0mR" "RES 0402/1005 RF" 411.931,235.364 r0 top
R530 "10kR" "RES 0402/1005 RF" 226.325,172.228 r180 top
R531 "10kR" "RES 0402/1005 RF" 226.325,170.618 r180 top
R532 "75R" "RES 0402/1005 RF" 448.716,343.928 r90 top
R533 "30R" "RES 0402/1005 RF" 448.716,341.838 r90 top
R534 "100R" "RES 0402/1005 RF" 452.272,329.692 r0 top
R535 "100R" "RES 0402/1005 RF" 424.205,329.184 r0 top
R536 "150R" "RES 0402/1005 RF" 437.168,349.268 r180 top
R537 "150R" "RES 0402/1005 RF" 441.518,349.268 r180 top
R538 "1kR" "RES 0402/1005 RF" 361.391,37.401 r0 top
R539 "160R" "RES 0402/1005 RF" 429.666,325.12 r270 top
R540 "0R" "RES 0402/1005 RF" 327.843,190.483 r270 top
R541 "100R" "RES 0402/1005 RF" 368.249,88.519 r90 top
R542 "100R" "RES 0402/1005 RF" 360.883,88.519 r90 top
R543 "100R" "RES 0402/1005 RF" 324.303,200.363 r180 top
R544 "1kR" "RES 0402/1005 RF" 323.98,168.53 r90 top
R545 "49.9R" "RES 0402/1005 RF" 324.303,197.569 r180 top
R546 "10kR" "RES 0402/1005 RF" 226.325,194.772 r180 top
R547 "10kR" "RES 0402/1005 RF" 226.325,175.449 r180 top
R548 "10kR" "RES 0402/1005 RF" 226.325,193.162 r180 top
R549 "10kR" "RES 0402/1005 RF" 226.325,189.941 r180 top
R550 "10kR" "RES 0402/1005 RF" 226.325,196.383 r180 top
R551 "10kR" "RES 0402/1005 RF" 226.325,188.331 r180 top
R552 "10kR" "RES 0402/1005 RF" 226.325,185.11 r180 top
R553 "10kR" "RES 0402/1005 RF" 226.325,197.993 r180 top
R554 "10kR" "RES 0402/1005 RF" 226.325,191.552 r180 top
R555 "10kR" "RES 0402/1005 RF" 226.325,186.721 r180 top
R556 "10kR" "RES 0402/1005 RF" 226.325,180.28 r180 top
R557 "10kR" "RES 0402/1005 RF" 226.325,173.838 r180 top
R558_I2C_Bridge "1kR" "RES 0402/1005 RF" 100.85,257.487 r270 top (schematic designator R558)
R558_I2C_Bridge_2 "1kR" "RES 0402/1005 RF" 414.223,46.787 r90 top (schematic designator R558)
R558_I2C_Bridge_3 "1kR" "RES 0402/1005 RF" 74.575,157.607 r270 top (schematic designator R558)
R559_I2C_Bridge "1kR" "RES 0402/1005 RF" 99.665,257.487 r270 top (schematic designator R559)
R559_I2C_Bridge_2 "1kR" "RES 0402/1005 RF" 387.553,46.787 r90 top (schematic designator R559)
R559_I2C_Bridge_3 "1kR" "RES 0402/1005 RF" 73.609,157.607 r270 top (schematic designator R559)
R560_I2C_Bridge "1kR" "RES 0402/1005 RF" 98.552,257.487 r270 top (schematic designator R560)
R560_I2C_Bridge_2 "1kR" "RES 0402/1005 RF" 360.883,46.787 r90 top (schematic designator R560)
R560_I2C_Bridge_3 "1kR" "RES 0402/1005 RF" 72.644,157.607 r270 top (schematic designator R560)
R561 "0mR" "RES 0402/1005 RF" 198.469,149.246 r180 bottom
R562 "0mR" "RES 0402/1005 RF" 198.461,150.265 r180 bottom
R563 "0mR" "RES 0402/1005 RF" 198.469,148.246 r180 bottom
R564 "0mR" "RES 0402/1005 RF" 198.461,147.249 r180 bottom
R565 "0mR" "RES 0402/1005 RF" 201.411,149.246 r0 bottom
R566 "0mR" "RES 0402/1005 RF" 201.411,150.265 r0 bottom
R567 "0mR" "RES 0402/1005 RF" 201.411,148.246 r0 bottom
R568 "0mR" "RES 0402/1005 RF" 201.411,147.249 r0 bottom
R569 "0mR" "RES 0402/1005 RF" 265.855,182.786 r180 bottom
R570 "0mR" "RES 0402/1005 RF" 265.855,183.751 r180 bottom
R571 "0mR" "RES 0402/1005 RF" 265.855,181.846 r180 bottom
R572 "0mR" "RES 0402/1005 RF" 265.855,180.907 r180 bottom
R573 "0mR" "RES 0402/1005 RF" 268.605,182.786 r0 bottom
R574 "0mR" "RES 0402/1005 RF" 268.605,183.751 r0 bottom
R575 "0mR" "RES 0402/1005 RF" 268.605,181.846 r0 bottom
R576 "0mR" "RES 0402/1005 RF" 268.605,180.907 r0 bottom
R577 "0mR" "RES 0402/1005 RF" 218.852,140.072 r180 bottom
R578 "0mR" "RES 0402/1005 RF" 218.852,141.279 r180 bottom
R579 "0mR" "RES 0402/1005 RF" 218.852,138.865 r180 bottom
R580 "0mR" "RES 0402/1005 RF" 218.852,137.658 r180 bottom
R581 "0mR" "RES 0402/1005 RF" 221.658,140.072 r0 bottom
R582 "0mR" "RES 0402/1005 RF" 221.658,141.279 r0 bottom
R583 "0mR" "RES 0402/1005 RF" 221.658,138.865 r0 bottom
R584 "0mR" "RES 0402/1005 RF" 221.647,137.658 r0 bottom
R585 "0mR" "RES 0402/1005 RF" 219.893,124.855 r270 bottom
R586 "0mR" "RES 0402/1005 RF" 218.851,124.855 r270 bottom
R587 "0mR" "RES 0402/1005 RF" 220.909,124.855 r270 bottom
R588 "0mR" "RES 0402/1005 RF" 221.959,124.855 r270 bottom
R589 "0mR" "RES 0402/1005 RF" 219.893,127.328 r90 bottom
R590 "0mR" "RES 0402/1005 RF" 218.861,127.328 r90 bottom
R591 "0mR" "RES 0402/1005 RF" 220.909,127.328 r90 bottom
R592 "0mR" "RES 0402/1005 RF" 221.959,127.333 r90 bottom
R593 "0mR" "RES 0402/1005 RF" 58.339,44.108 r90 bottom
R594 "0mR" "RES 0402/1005 RF" 57.264,44.104 r90 bottom
R595 "0mR" "RES 0402/1005 RF" 59.434,41.45 r270 bottom
R596 "0mR" "RES 0402/1005 RF" 60.53,41.45 r270 bottom
R597 "0mR" "RES 0402/1005 RF" 58.339,41.45 r270 bottom
R598 "0mR" "RES 0402/1005 RF" 57.264,41.45 r270 bottom
R599 "1kR" "RES 0402/1005 RF" 360.883,28.042 r90 top
R600 "0mR" "RES 0402/1005 RF" 367.741,34.29 r90 top
R601 "0mR" "RES 0402/1005 RF" 360.883,34.29 r90 top
R602 "10kR" "RES 0402/1005 RF" 378.714,52.959 r0 top
R603 "10kR" "RES 0402/1005 RF" 374.383,52.959 r0 top
R604 "10kR" "RES 0402/1005 RF" 370.053,52.959 r0 top
R605 "10kR" "RES 0402/1005 RF" 365.722,52.959 r0 top
R606 "10kR" "RES 0402/1005 RF" 361.391,52.959 r0 top
R607 "0mR" "RES 0402/1005 RF" 390.347,28.042 r90 top
R608 "10kR" "RES 0402/1005 RF" 365.722,27.521 r0 top
R609 "10kR" "RES 0402/1005 RF" 358.267,30.759 r0 top
R610 "1.33kR" "RES 0402/1005 RF" 118.096,45.463 r180 top
R611 "1.33kR" "RES 0402/1005 RF" 127.519,45.198 r0 top
R612 "270R" "RES 0402/1005 RF" 116.226,37.426 r270 top
R613 "2.4R" "RES 1206/3216" 112.233,68.85 r0 top
R614 "270R" "RES 0402/1005 RF" 127.404,37.326 r270 top
R615 "10kR" "RES 0402/1005 RF" 123.378,38.69 r90 bottom
R616 "2.4R" "RES 1206/3216" 132.685,68.801 r180 top
R617 "PU5931FKMP70R004L" PU5931 157.952,100.98 r90 top
R618 "10kR" "RES 0402/1005 RF" 476.987,46.507 r90 top
R619 "1.91kR" "RES 0402/1005 RF" 209.916,44.86 r90 top
R620 "2kR" "RES 0402/1005 RF" 217.055,44.86 r90 top
R621 "147kR" "RES 0402/1005 RF" 201.462,52.737 r180 top
R622 "340kR" "RES 0402/1005 RF" 225.397,52.437 r0 top
R623 "1.43kR" "RES 0402/1005 RF" 217.655,40.305 r180 top
R624 "15kR" "RES 0402/1005 RF" 209.351,40.359 r0 top
R625 "1.4kR" "RES 0201/0603" 161.943,42.063 r0 top
R626 "200kR" "RES 0402/1005 RF" 162.337,35.058 r180 top
R627 "10.5kR" "RES 0402/1005 RF" 162.314,36.005 r0 top
R628 "750kR" "RES 0402/1005 RF" 177.372,50.245 r0 top
R629 "Resistance" "RES 0402/1005 RF" 165.533,43.718 r270 top
R630 "10kR" "RES 0402/1005 RF" 67.085,28.871 r90 top
R631 "5.9kR" "RES 0402/1005 RF" 170.224,37 r180 top
R632 "100kR" "RES 0402/1005 RF" 180.547,132.705 r90 top
R633 "100kR" "RES 0402/1005 RF" 180.597,127.878 r90 top
R634 "100kR" "RES 0402/1005 RF" 180.597,122.669 r90 top
R635 "10k" "RES 0402/1005 RF" 468.147,29.337 r0 top
R636 "0R" "RES 0402/1005 RF" 463.817,29.337 r0 top
R637 "0R" "RES 0402/1005 RF" 459.486,29.337 r0 top
R638 "0R" "RES 0402/1005 RF" 455.168,29.337 r0 top
R639 "0R" "RES 0402/1005 RF" 450.837,29.337 r0 top
R640 "0R" "RES 0402/1005 RF" 446.507,29.337 r0 top
R641 "0R" "RES 0402/1005 RF" 442.176,29.337 r0 top
R642 "0R" "RES 0402/1005 RF" 437.845,29.337 r0 top
R643 "0R" "RES 0402/1005 RF" 433.514,29.337 r0 top
R644 "9.1kR" "RES 0402/1005 RF" 158.898,149.862 r270 top
R645 "13kR" "RES 0402/1005 RF" 158.898,151.95 r270 top
R646 "100kR" "RES 0402/1005 RF" 156.588,152.612 r90 top
R647 "100kR" "RES 0402/1005 RF" 421.348,41.44 r0 top
R648 "2R" "RES 0402/1005 RF" 425.666,41.44 r0 top
R649 "10kR" "RES 0402/1005 RF" 417.017,41.44 r0 top
R650 "100MR" "RES 0402/1005 RF" 412.686,41.44 r0 top
R651 "10kR" "RES 0402/1005 RF" 408.356,41.44 r0 top
R652 "1MR" "RES 0402/1005 RF" 404.025,41.44 r0 top
R653 "20R" "RES 0402/1005 RF" 393.522,41.44 r0 top
R654 "100R" "RES 0402/1005 RF" 389.204,41.44 r0 top
R655 "10kR" "RES 0402/1005 RF" 378.701,41.44 r0 top
R656 "10kR" "RES 0402/1005 RF" 374.371,41.44 r0 top
R657 "100R" "RES 0402/1005 RF" 370.04,41.44 r0 top
R658 "10kR" "RES 0402/1005 RF" 365.709,41.44 r0 top
R659 "10kR" "RES 0402/1005 RF" 469.621,46.507 r90 top
R660 "10kR" "RES 0402/1005 RF" 462.255,46.507 r90 top
R661 "10kR" "RES 0402/1005 RF" 455.397,46.507 r90 top
R662 "10kR" "RES 0402/1005 RF" 448.031,46.507 r90 top
R663 "10kR" "RES 0402/1005 RF" 440.665,46.507 r90 top
R664 "10kR" "RES 0402/1005 RF" 433.299,46.507 r90 top
R665 "0mR" "RES 0402/1005 RF" 58.128,77.884 r180 top
R666 "12mR" "RES 1206/3216" 78.313,71.605 r0 top
R667 "24.9kR" "RES 0402/1005 RF" 50.946,77.43 r90 top
R668 "20kR" "RES 0402/1005 RF" 360.883,168.402 r90 top
R669 "0mR" "RES 0402/1005 RF" 48.076,81.086 r90 top
R670 "0mR" "RES 0402/1005 RF" 49.059,82.536 r90 top
R671 "1.87kR" "RES 0402/1005 RF" 301.054,174.47 r0 top
R672 "1.5kR" "RES 0402/1005 RF" 299.259,175.27 r270 top
R673 "1.87kR" "RES 0402/1005 RF" 301.218,168.891 r180 top
R674 "15kR" "RES 0402/1005 RF" 302.202,167.138 r180 top
R675 "0mR" "RES 0402/1005 RF" 114.926,111.784 r0 top
R676 "20kR" "RES 0402/1005 RF" 300.104,167.138 r0 top
R677 "95.3kR" "RES 0402/1005 RF" 66.785,35.022 r180 top
R678 "95.3kR" "RES 0402/1005 RF" 66.785,35.972 r180 top
R679 "95.3kR" "RES 0402/1005 RF" 69.299,34.041 r0 top
R680 "95.3kR" "RES 0402/1005 RF" 69.309,36.052 r0 top
R681 "24.9kR" "RES 0402/1005 RF" 68.053,28.871 r90 top
R682 "7.5kR" "RES 0402/1005 RF" 66.785,34.081 r0 top
R683 "4.87kR" "RES 0402/1005 RF" 66.785,36.958 r0 top
R684 "7.15kR" "RES 0402/1005 RF" 69.309,35.032 r180 top
R685 "5.9kR" "RES 0402/1005 RF" 69.303,37.017 r180 top
R686 "412kR" "RES 0402/1005 RF" 155.203,50.245 r180 top
R687 "57.6kR" "RES 0402/1005 RF" 161.778,37.015 r0 top
R688 "10kR" "RES 0402/1005 RF" 425.933,46.507 r90 top
R689 "20kR" "RES 0402/1005 RF" 219.964,211.107 r270 top
R690 "100kR" "RES 0402/1005 RF" 220.929,211.107 r270 top
R691 "20kR" "RES 0402/1005 RF" 213.741,209.232 r270 top
R692 "0R" "RES 0402/1005 RF" 367.309,172.187 r90 top
R693 "0mR" "RES 0402/1005 RF" 400.202,202.641 r90 top
R694 "1kR" "RES 0402/1005 RF" 386.969,202.641 r90 top
R695 "100R" "RES 0402/1005 RF" 368.249,202.641 r90 top
R696 "0mR" "RES 0402/1005 RF" 360.883,202.641 r90 top
R697 "0mR" "RES 0402/1005 RF" 476.679,229.356 r180 top
R698 "0mR" "RES 0402/1005 RF" 479.43,229.356 r0 top
R699 "0mR" "RES 0402/1005 RF" 476.679,230.362 r180 top
R700 "0mR" "RES 0402/1005 RF" 479.43,230.362 r0 top
R701 "0mR" "RES 0402/1005 RF" 476.679,231.39 r180 top
R702 "0mR" "RES 0402/1005 RF" 479.43,231.39 r0 top
R703 "0mR" "RES 0402/1005 RF" 492.506,251.174 r180 top
R704 "0mR" "RES 0402/1005 RF" 495.219,251.174 r0 top
R705 "0mR" "RES 0402/1005 RF" 492.506,252.139 r180 top
R706 "0mR" "RES 0402/1005 RF" 495.219,252.139 r0 top
R707 "0mR" "RES 0402/1005 RF" 492.506,253.124 r180 top
R708 "0mR" "RES 0402/1005 RF" 495.219,253.124 r0 top
R709 "2.2kR" "RES 0402/1005 RF" 422.707,76.022 r90 top
R710 "10kR" "RES 0402/1005 RF" 408.229,76.022 r90 top
R711 "0mR" "RES 0402/1005 RF" 388.645,76.022 r90 top
R712 "0mR" "RES 0402/1005 RF" 395.249,76.022 r90 top
R713 "0mR" "RES 0402/1005 RF" 375.107,76.022 r90 top
R714 "2.2kR" "RES 0402/1005 RF" 367.995,76.022 r90 top
R715 "10kR" "RES 0402/1005 RF" 360.883,76.022 r90 top
R716 "261R" "RES 0402/1005 RF" 394.056,113.081 r90 top
R717 "261R" "RES 0402/1005 RF" 386.944,113.081 r90 top
R718 "261R" "RES 0402/1005 RF" 379.832,113.081 r90 top
R719 "261R" "RES 0402/1005 RF" 372.72,113.081 r90 top
R720 "261R" "RES 0402/1005 RF" 365.354,113.081 r90 top
R721 "10k" "RES 0402/1005 RF" 484.683,56.236 r90 top
R722 "0R" "RES 0402/1005 RF" 477.317,56.236 r90 top
R723 "0R" "RES 0402/1005 RF" 469.951,56.236 r90 top
R724 "0R" "RES 0402/1005 RF" 462.585,56.236 r90 top
R725 "0R" "RES 0402/1005 RF" 455.219,56.236 r90 top
R726 "0R" "RES 0402/1005 RF" 447.853,56.236 r90 top
R727 "0R" "RES 0402/1005 RF" 440.487,56.236 r90 top
R728 "0R" "RES 0402/1005 RF" 433.121,56.236 r90 top
R729 "0R" "RES 0402/1005 RF" 425.755,56.236 r90 top
R730 "4.7kR" "RES 0402/1005 RF" 389.407,56.236 r90 top
R731 "4.7kR" "RES 0402/1005 RF" 396.799,56.236 r90 top
R732 "4.7kR" "RES 0402/1005 RF" 403.657,56.236 r90 top
R733 "4.7kR" "RES 0402/1005 RF" 411.023,56.236 r90 top
R734 "4.7kR" "RES 0402/1005 RF" 418.389,56.236 r90 top
R735 "10kR" "RES 0402/1005 RF" 360.883,40.056 r90 top
R736 "0mR" "RES 0402/1005 RF" 382.981,28.042 r90 top
R737 "10kR" "RES 0402/1005 RF" 106.856,111.784 r0 top
R738 "0mR" "RES 0402/1005 RF" 494.067,229.065 r180 top
R739 "0mR" "RES 0402/1005 RF" 496.783,229.065 r0 top
R740 "0mR" "RES 0402/1005 RF" 494.067,230.174 r180 top
R741 "0mR" "RES 0402/1005 RF" 496.783,230.174 r0 top
R742 "0mR" "RES 0402/1005 RF" 494.067,231.199 r180 top
R743 "0mR" "RES 0402/1005 RF" 496.783,231.199 r0 top
R744 "10kR" "RES 0402/1005 RF" 418.567,46.507 r90 top
R745 "20kR" "RES 0402/1005 RF" 298.709,176.805 r0 top
R746 "10kR" "RES 0402/1005 RF" 101.476,108.468 r0 top
R747 "10kR" "RES 0402/1005 RF" 109.546,106.81 r0 top
R748 "10kR" "RES 0402/1005 RF" 104.166,108.468 r0 top
R749 "10kR" "RES 0402/1005 RF" 98.786,108.468 r0 top
R750 "10kR" "RES 0402/1005 RF" 101.476,105.152 r0 top
R751 "10kR" "RES 0402/1005 RF" 109.546,105.152 r0 top
R752 "10kR" "RES 0402/1005 RF" 112.236,108.468 r0 top
R753 "10kR" "RES 0402/1005 RF" 98.786,105.152 r0 top
R754 "10kR" "RES 0402/1005 RF" 114.926,106.81 r0 top
R755 "10kR" "RES 0402/1005 RF" 101.476,106.81 r0 top
R756 "10kR" "RES 0402/1005 RF" 109.546,108.468 r0 top
R757 "10kR" "RES 0402/1005 RF" 112.236,106.81 r0 top
R758 "0mR" "RES 0402/1005 RF" 477.763,197.199 r180 top
R759 "0mR" "RES 0402/1005 RF" 480.654,197.189 r0 top
R760 "0mR" "RES 0402/1005 RF" 477.764,198.206 r180 top
R761 "0mR" "RES 0402/1005 RF" 480.654,198.196 r0 top
R762 "0mR" "RES 0402/1005 RF" 477.764,199.196 r180 top
R763 "0mR" "RES 0402/1005 RF" 480.654,199.187 r0 top
R764 "WSHP28184L000FEA" WSHP2818 65.796,93.023 r270 top
R765 "0mR" "RES 0402/1005 RF" 375.615,28.042 r90 top
R766 "0mR" "RES 0402/1005 RF" 368.249,28.042 r90 top
R767 "0mR" "RES 0402/1005 RF" 359.221,28.339 r90 top
R768 "0mR" "RES 0402/1005 RF" 710.209,34.29 r90 top
R769 "0mR" "RES 0402/1005 RF" 702.843,34.29 r90 top
R770 "0mR" "RES 0402/1005 RF" 695.477,34.29 r90 top
R771 "0mR" "RES 0402/1005 RF" 688.619,34.29 r90 top
R772 "0mR" "RES 0402/1005 RF" 681.253,34.29 r90 top
R773 "0mR" "RES 0402/1005 RF" 673.887,34.29 r90 top
R774 "0mR" "RES 0402/1005 RF" 666.521,34.29 r90 top
R775 "0mR" "RES 0402/1005 RF" 659.155,34.29 r90 top
R776 "0mR" "RES 0402/1005 RF" 651.789,34.29 r90 top
R777 "0mR" "RES 0402/1005 RF" 644.423,34.29 r90 top
R778 "0mR" "RES 0402/1005 RF" 637.057,34.29 r90 top
R779 "0mR" "RES 0402/1005 RF" 629.691,34.29 r90 top
R780 "0mR" "RES 0402/1005 RF" 622.325,34.29 r90 top
R781 "0mR" "RES 0402/1005 RF" 615.467,34.29 r90 top
R782 "0mR" "RES 0402/1005 RF" 608.076,34.29 r90 top
R783 "0mR" "RES 0402/1005 RF" 600.71,34.29 r90 top
R784 "0mR" "RES 0402/1005 RF" 593.344,34.29 r90 top
R785 "0mR" "RES 0402/1005 RF" 585.978,34.29 r90 top
R786 "0mR" "RES 0402/1005 RF" 578.612,34.29 r90 top
R787 "0mR" "RES 0402/1005 RF" 571.246,34.29 r90 top
R788 "0mR" "RES 0402/1005 RF" 563.88,34.29 r90 top
R789 "0mR" "RES 0402/1005 RF" 556.514,34.29 r90 top
R790 "0mR" "RES 0402/1005 RF" 549.148,34.29 r90 top
R791 "0mR" "RES 0402/1005 RF" 542.29,34.29 r90 top
R792 "0mR" "RES 0402/1005 RF" 534.924,34.29 r90 top
R793 "0mR" "RES 0402/1005 RF" 527.558,34.29 r90 top
R794 "0mR" "RES 0402/1005 RF" 520.192,34.29 r90 top
R795 "0mR" "RES 0402/1005 RF" 512.826,34.29 r90 top
R796 "0mR" "RES 0402/1005 RF" 505.46,34.29 r90 top
R797 "0mR" "RES 0402/1005 RF" 498.069,34.29 r90 top
R798 "0mR" "RES 0402/1005 RF" 490.703,34.29 r90 top
R799 "0mR" "RES 0402/1005 RF" 483.337,34.29 r90 top
R800 "0mR" "RES 0402/1005 RF" 475.971,34.29 r90 top
R801 "0mR" "RES 0402/1005 RF" 469.113,34.29 r90 top
R802 "0mR" "RES 0402/1005 RF" 461.747,34.29 r90 top
R803 "0mR" "RES 0402/1005 RF" 454.381,34.29 r90 top
R804 "0mR" "RES 0402/1005 RF" 447.015,34.29 r90 top
R805 "0mR" "RES 0402/1005 RF" 439.649,34.29 r90 top
R806 "0mR" "RES 0402/1005 RF" 432.283,34.29 r90 top
R807 "0mR" "RES 0402/1005 RF" 424.917,34.29 r90 top
R808 "0mR" "RES 0402/1005 RF" 417.551,34.29 r90 top
R809 "0mR" "RES 0402/1005 RF" 410.185,34.29 r90 top
R810 "0mR" "RES 0402/1005 RF" 403.073,34.29 r90 top
R811 "0mR" "RES 0402/1005 RF" 396.443,34.29 r90 top
R812 "0mR" "RES 0402/1005 RF" 389.331,34.29 r90 top
R813 "0mR" "RES 0402/1005 RF" 382.219,34.29 r90 top
R814 "0mR" "RES 0402/1005 RF" 375.107,34.29 r90 top
R815 "0mR" "RES 0402/1005 RF" 367.995,34.29 r90 top
R816 "0mR" "RES 0402/1005 RF" 360.883,34.29 r90 top
R817 "10kR" "RES 0402/1005 RF" 411.455,46.507 r90 top
R818 "10kR" "RES 0402/1005 RF" 404.343,46.507 r90 top
R819 "10kR" "RES 0402/1005 RF" 397.205,46.507 r90 top
R820 "10kR" "RES 0402/1005 RF" 389.839,46.507 r90 top
R821 "10kR" "RES 0402/1005 RF" 382.981,46.507 r90 top
R822 "10kR" "RES 0402/1005 RF" 375.615,46.507 r90 top
R823 "10kR" "RES 0402/1005 RF" 368.249,46.507 r90 top
R824 "10kR" "RES 0402/1005 RF" 360.883,46.507 r90 top
R832 "100kR" "RES 0402/1005 RF" 426.695,28.042 r90 top
R833 "10kR" "RES 0402/1005 RF" 419.329,28.042 r90 top
R834 "10kR" "RES 0402/1005 RF" 411.963,28.042 r90 top
R835 "100kR" "RES 0402/1005 RF" 404.597,28.042 r90 top
R836 "10kR" "RES 0402/1005 RF" 397.205,28.042 r90 top
R837 "10kR" "RES 0402/1005 RF" 389.839,28.042 r90 top
R838 "20kR" "RES 0402/1005 RF" 382.473,28.042 r90 top
R839 "10kR" "RES 0402/1005 RF" 375.107,28.042 r90 top
R840 "20kR" "RES 0402/1005 RF" 367.741,28.042 r90 top
R841 "20kR" "RES 0402/1005 RF" 360.883,28.042 r90 top
S1 "Mode Switch" SO8_N 229.603,223.774 r180 top
S2 "430181038816" 430181038816 402.45,61.481 r90 top
S3 "430181038816" 430181038816 397.015,61.951 r90 top
S4 "430181038816" 430181038816 389.433,63.233 r90 top
S5 "Mode Switch" SO8_N 382.27,20.13 r0 top
S6 "430181038816" 430181038816 362.89,168.529 r90 top
S7 "430181038816" 430181038816 384.226,72.365 r90 top
T5 "BSC080N03LSG" BSC080N03LS 111.494,62.061 r180 top
T6 "BSC080N03LSG" BSC080N03LS 111.494,55.061 r180 top
T7 "BSC030N03LS-G" BSC030N03LS 118.727,55.061 r180 top
T8 "BSC030N03LS-G" BSC030N03LS 118.727,62.061 r180 top
T9 "BSC080N03LSG" BSC080N03LS 133.515,62.061 r0 top
T10 "BSC080N03LSG" BSC080N03LS 133.515,55.061 r0 top
T11 "BSC030N03LS-G" BSC030N03LS 126.252,62.061 r0 top
T12 "BSC030N03LS-G" BSC030N03LS 126.252,55.061 r0 top
T13 "BSC080N03LSG" BSC080N03LS 200.343,57.051 r180 top
T14 "BSC030N03LS-G" BSC030N03LS 207.929,57.051 r180 top
T15 "BSC080N03LSG" BSC080N03LS 226.617,57.083 r0 top
T16 "BSC030N03LS-G" BSC030N03LS 219.085,57.083 r0 top
T17 "BSC080N03LSG" BSC080N03LS 153.359,53.955 r180 top
T18 "BSC030N03LS-G" BSC030N03LS 160.988,53.955 r180 top
T19 "BSC080N03LSG" BSC080N03LS 178.772,54.055 r0 top
T20 "BSC030N03LS-G" BSC030N03LS 170.916,54.055 r0 top